# Altium PCB Electrode_Ribbon_PCB_v3.1.PcbDoc (part 3 of 5)
Units mil, origin at the board's own origin, x right, y up, seen from the top; angles counter-clockwise.
Board outline 8303.83 x 5482.84 mil, 2 copper layers (Top Layer, Bottom Layer), stack 3.556 mil thick; 265 components, 171 nets, 720 pads, 346 vias.
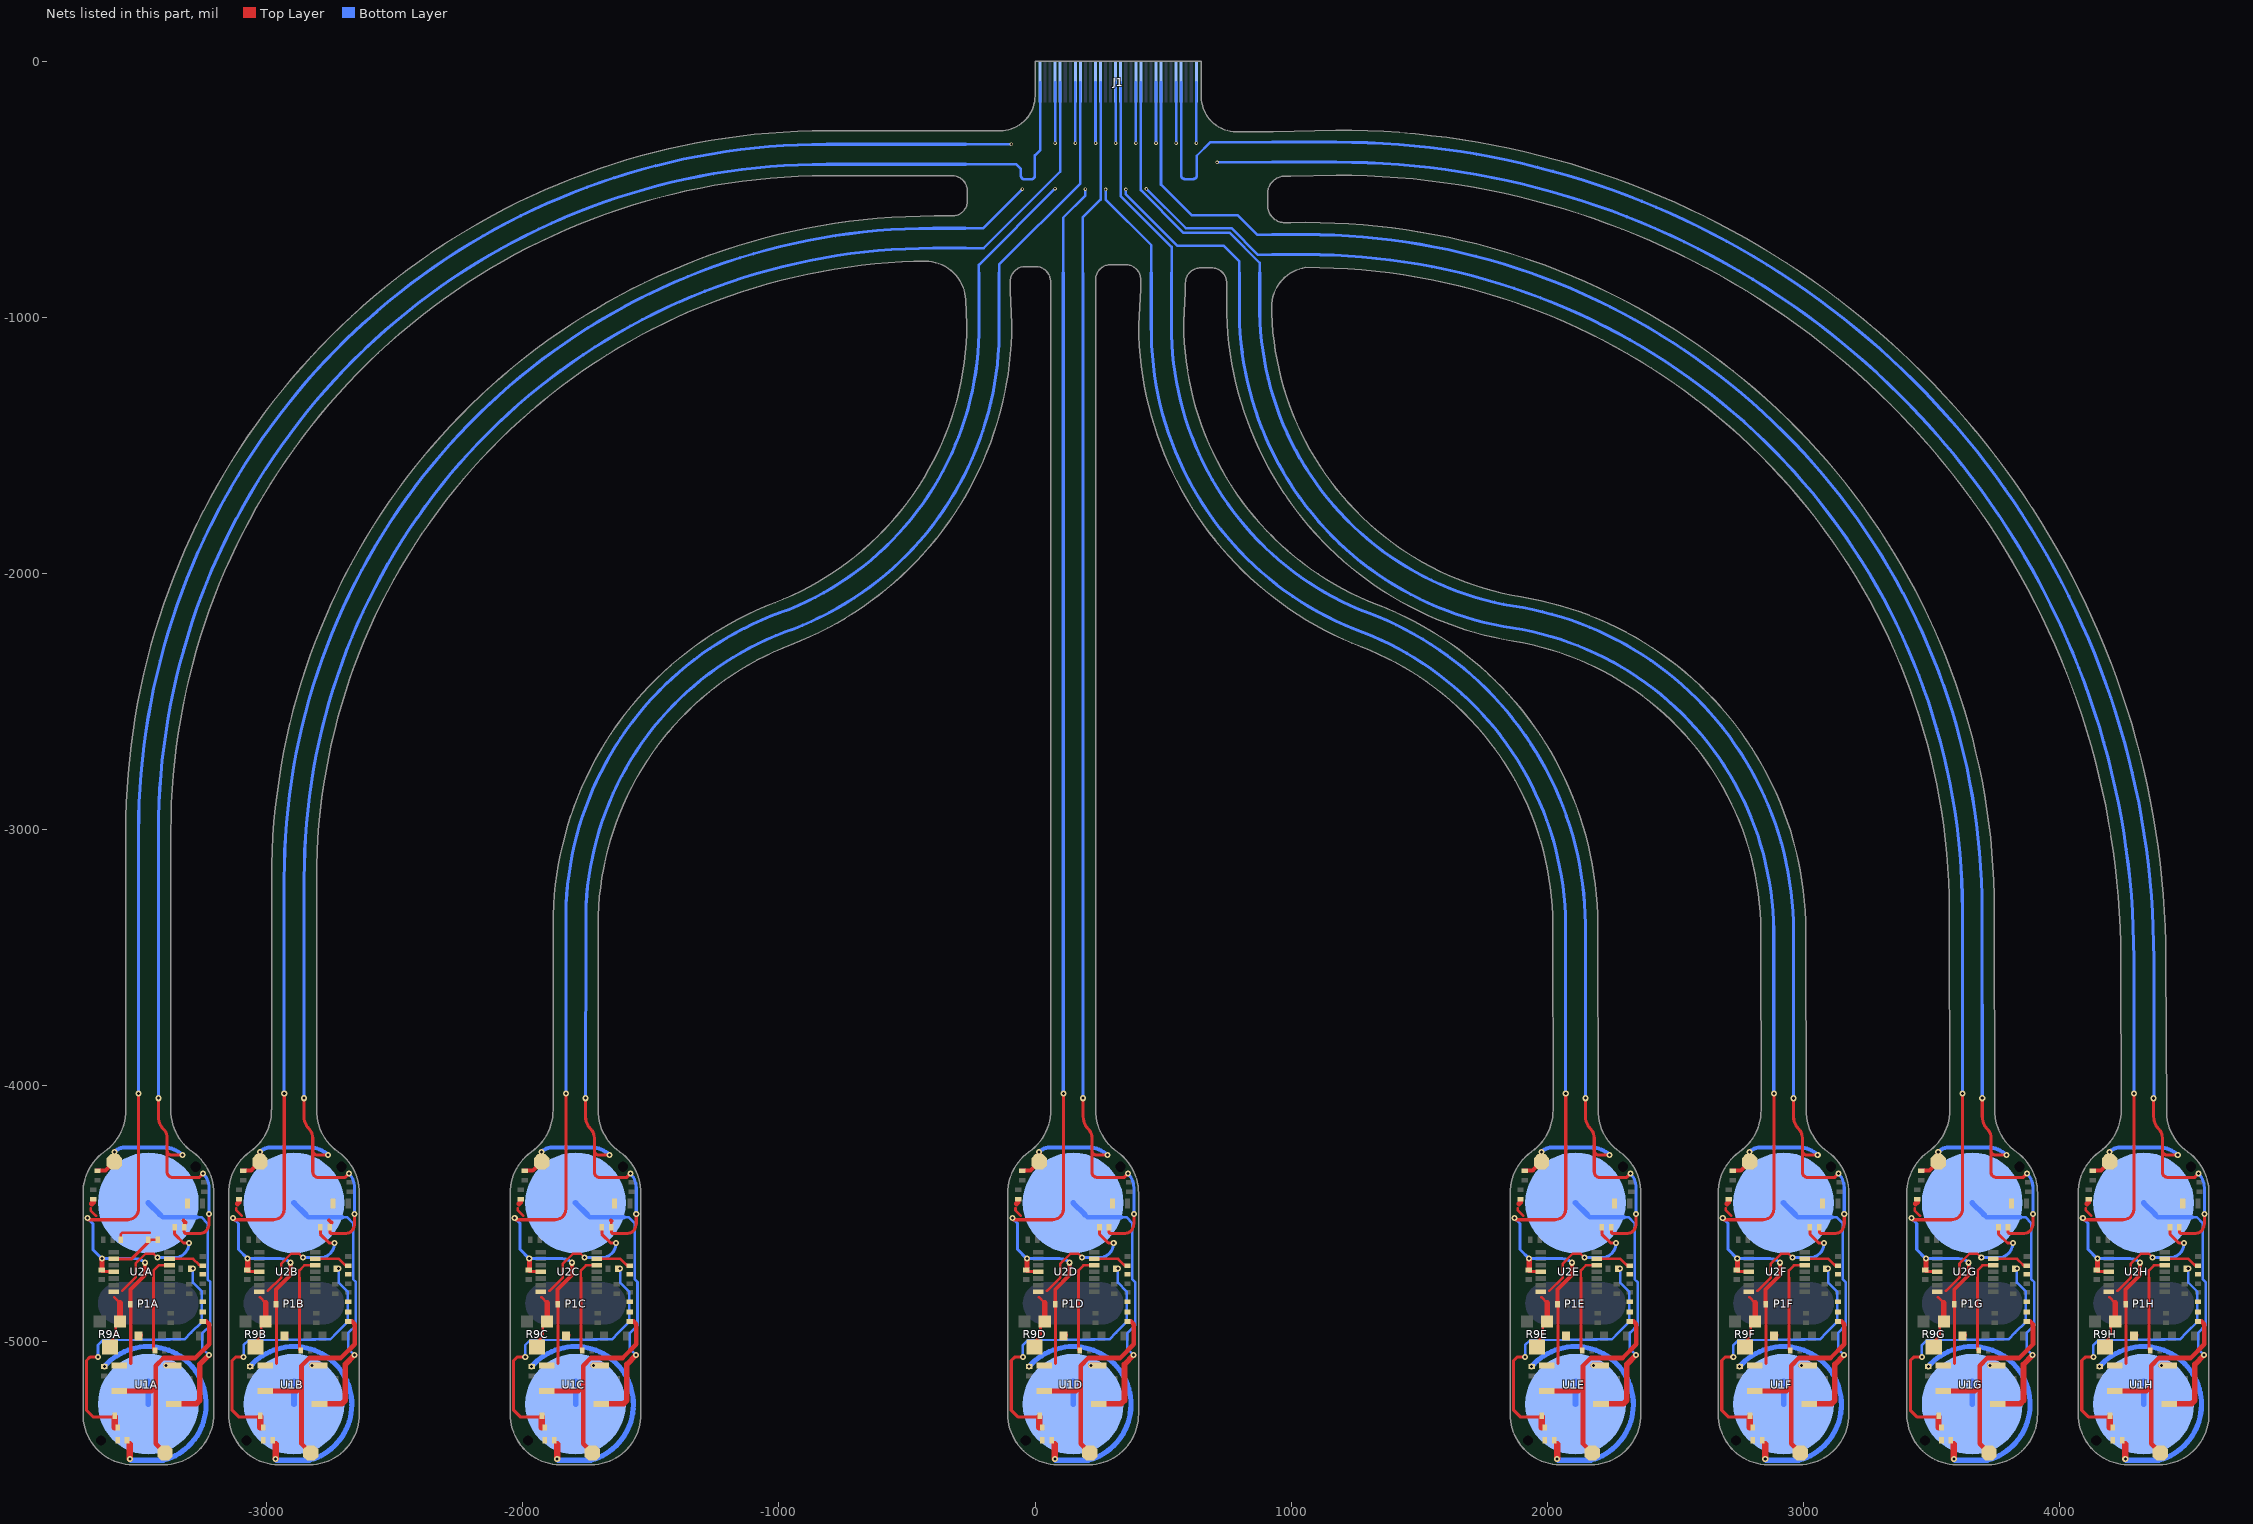
[diagram p2: the nets of this part, all layers, seen from the top]

## Via types
v1: diameter 23.62, hole 11.81, Top Layer to Bottom Layer, tented both sides, 304 vias
v2: diameter 13.78, hole 7.87, Top Layer to Bottom Layer, 42 vias

## Nets (pads, with @x,y where several pads share a name; then routed paths per layer and width w, separated by ;. In a path a pad name is that pad's centre, name@x,y a point inside that pad or via, vN(x,y) a via of type N, cw(c..) or ccw(c..) an arc to the next point about the centre after c; other vN are vias at no path point) (continued)
-VCC_3V3: C5A.1 C5B.1 C5C.1 C5D.1 C5E.1 C5F.1 C5G.1 C5H.1 C6A.1 C6B.1 C6C.1 C6D.1 C6E.1 C6F.1 C6G.1 C6H.1 J1.4 J1.8 J1.12 J1.16 J1.20 J1.24 J1.28 J1.32 SB2A.1 SB2B.1 SB2C.1 SB2D.1 SB2E.1 SB2F.1 SB2G.1 SB2H.1 SB4A.2 SB4B.2 SB4C.2 SB4D.2 SB4E.2 SB4F.2 SB4G.2 SB4H.2 SB5A.2 SB5B.2 SB5C.2 SB5D.2 SB5E.2 SB5F.2 SB5G.2 SB5H.2 U1A.5 U1B.5 U1C.5 U1D.5 U1E.5 U1F.5 U1G.5 U1H.5 U2A.11 U2B.11 U2C.11 U2D.11 U2E.11 U2F.11 U2G.11 U2H.11 | length 62483.9
  Top Layer w10: -3688.51,-4480.28 -3688.51,-4489.4 -3667.12,-4510.78 ; C6A.1@-3645.89,-4722.28 -3643.89,-4722.28 C6A.1@-3642.39,-4722.28 ; -3119.53,-4480.28 -3119.53,-4489.4 -3098.14,-4510.78 ; C6B.1@-3076.92,-4722.28 -3074.92,-4722.28 C6B.1@-3073.42,-4722.28 ; -2019.75,-4480.28 -2019.75,-4489.4 -1998.36,-4510.78 ; C6C.1@-1977.13,-4722.28 -1975.13,-4722.28 C6C.1@-1973.63,-4722.28 ; -76.26,-4480.28 -76.26,-4489.4 -54.87,-4510.78 ; C6D.1@-33.65,-4722.28 -31.65,-4722.28 C6D.1@-30.15,-4722.28 ; 1885.9,-4480.28 1885.9,-4489.4 1907.29,-4510.78 ; C6E.1@1928.52,-4722.28 1930.52,-4722.28 C6E.1@1932.02,-4722.28 ; 2698.62,-4480.29 2698.62,-4489.4 2720,-4510.79 ; C6F.1@2741.23,-4722.29 2743.23,-4722.29 C6F.1@2744.73,-4722.29 ; 3435.37,-4480.28 3435.37,-4489.4 3456.75,-4510.78 ; C6G.1@3477.98,-4722.28 3479.98,-4722.28 C6G.1@3481.48,-4722.28 ; 4104.84,-4480.28 4104.84,-4489.4 4126.23,-4510.78 ; C6H.1@4147.45,-4722.28 4149.45,-4722.28 C6H.1@4150.95,-4722.28
  Top Layer w12: v1@-3697.89,-4525.78 -3543.37,-4525.78 ccw(c-3543.37,-4483.76) -3501.35,-4483.76 v1(-3501.35,-4033) ; C6A.1@-3643.89,-4723.78 -3639.14,-4728.54 -3600.37,-4728.54 U2A.11@-3599.12,-4729.78 ; -3531.87,-5086.78 SB4A.2@-3531.87,-4860.78 ; v1@-3128.92,-4525.78 -2974.4,-4525.78 ccw(c-2974.4,-4483.76) -2932.38,-4483.76 v1(-2932.38,-4033) ; C6B.1@-3074.92,-4723.78 -3070.16,-4728.54 -3031.39,-4728.54 U2B.11@-3030.15,-4729.78 ; -2962.9,-5086.78 SB4B.2@-2962.9,-4860.78 ; v1@-2029.13,-4525.78 -1874.61,-4525.78 ccw(c-1874.61,-4483.76) -1832.59,-4483.76 v1(-1832.59,-4033) ; C6C.1@-1975.13,-4723.78 -1970.38,-4728.54 -1931.61,-4728.54 U2C.11@-1930.36,-4729.78 ; -1863.11,-5086.78 SB4C.2@-1863.11,-4860.78 ; v1@-85.65,-4525.78 68.87,-4525.78 ccw(c68.87,-4483.76) 110.89,-4483.76 v1(110.89,-4033) ; C6D.1@-31.65,-4723.78 -26.89,-4728.54 11.87,-4728.54 U2D.11@13.12,-4729.78 ; 80.37,-5086.78 SB4D.2@80.37,-4860.78 ; v1@1876.52,-4525.78 2031.04,-4525.78 ccw(c2031.04,-4483.76) 2073.06,-4483.76 v1(2073.06,-4033) ; C6E.1@1930.52,-4723.78 1935.27,-4728.54 1974.04,-4728.54 U2E.11@1975.28,-4729.78 ; 2042.54,-5086.78 SB4E.2@2042.54,-4860.78 ; v1@2689.23,-4525.79 2843.75,-4525.79 ccw(c2843.75,-4483.77) 2885.77,-4483.77 v1(2885.77,-4033.01) ; C6F.1@2743.23,-4723.79 2747.98,-4728.54 2786.75,-4728.54 U2F.11@2788,-4729.79 ; 2855.25,-5086.79 SB4F.2@2855.25,-4860.79 ; v1@3425.98,-4525.78 3580.5,-4525.78 ccw(c3580.5,-4483.76) 3622.52,-4483.76 v1(3622.52,-4033) ; C6G.1@3479.98,-4723.78 3484.73,-4728.54 3523.5,-4728.54 U2G.11@3524.75,-4729.78 ; 3592,-5086.78 SB4G.2@3592,-4860.78 ; v1@4095.45,-4525.78 4249.97,-4525.78 ccw(c4249.97,-4483.76) 4291.99,-4483.76 v1(4291.99,-4033) ; C6H.1@4149.45,-4723.78 4154.21,-4728.54 4192.98,-4728.54 U2H.11@4194.22,-4729.78 ; 4261.47,-5086.78 SB4H.2@4261.47,-4860.78
  Top Layer w15: SB4A.2@-3533.39,-4855.78 -3533.39,-4798.28 -3476.87,-4741.76 v1(-3476.87,-4693.78) ; SB4B.2@-2964.42,-4855.78 -2964.42,-4798.28 -2907.9,-4741.76 v1(-2907.9,-4693.78) ; SB4C.2@-1864.63,-4855.78 -1864.63,-4798.28 -1808.11,-4741.76 v1(-1808.11,-4693.78) ; SB4D.2@78.85,-4855.78 78.85,-4798.28 135.37,-4741.76 v1(135.37,-4693.78) ; SB4E.2@2041.02,-4855.78 2041.02,-4798.28 2097.54,-4741.76 v1(2097.54,-4693.78) ; SB4F.2@2853.73,-4855.79 2853.73,-4798.29 2910.25,-4741.77 v1(2910.25,-4693.79) ; SB4G.2@3590.48,-4855.78 3590.48,-4798.28 3647,-4741.76 v1(3647,-4693.78) ; SB4H.2@4259.95,-4855.78 4259.95,-4798.28 4316.47,-4741.76 v1(4316.47,-4693.78)
  Top Layer w20: -3684.12,-4463.42 -3678.12,-4457.42 ; C6A.1@-3643.89,-4723.78 -3643.89,-4722.28 v1@-3643.89,-4678.38 ; -3115.14,-4463.42 -3109.14,-4457.42 ; C6B.1@-3074.92,-4723.78 -3074.92,-4722.28 v1@-3074.92,-4678.38 ; -2015.36,-4463.42 -2009.36,-4457.42 ; C6C.1@-1975.13,-4723.78 -1975.13,-4722.28 v1@-1975.13,-4678.38 ; -71.87,-4463.42 -65.87,-4457.42 ; C6D.1@-31.65,-4723.78 -31.65,-4722.28 v1@-31.65,-4678.38 ; 1890.29,-4463.42 1896.29,-4457.42 ; C6E.1@1930.52,-4723.78 1930.52,-4722.28 v1@1930.52,-4678.38 ; 2703,-4463.42 2709,-4457.42 ; C6F.1@2743.23,-4723.79 2743.23,-4722.29 v1@2743.23,-4678.39 ; 3439.75,-4463.42 3445.75,-4457.42 ; C6G.1@3479.98,-4723.78 3479.98,-4722.28 v1@3479.98,-4678.38 ; 4109.23,-4463.42 4115.23,-4457.42 ; C6H.1@4149.45,-4723.78 4149.45,-4722.28 v1@4149.45,-4678.38
  Top Layer w22: -3535.89,-5401.78 -3535.2,-5402.47 ; v1@-3535.2,-5459.47 v1(-3534.89,-5459.78) ; -2966.92,-5401.78 -2966.23,-5402.47 ; v1@-2966.23,-5459.47 v1(-2965.92,-5459.78) ; -1867.13,-5401.78 -1866.44,-5402.47 ; v1@-1866.44,-5459.47 v1(-1866.13,-5459.78) ; 76.35,-5401.78 77.04,-5402.47 ; v1@77.04,-5459.47 v1(77.35,-5459.78) ; 2038.52,-5401.78 2039.21,-5402.47 ; v1@2039.21,-5459.47 v1(2039.52,-5459.78) ; 2851.23,-5401.79 2851.92,-5402.48 ; v1@2851.92,-5459.48 v1(2852.23,-5459.79) ; 3587.98,-5401.78 3588.67,-5402.47 ; v1@3588.67,-5459.47 v1(3588.98,-5459.78) ; 4257.45,-5401.78 4258.14,-5402.47 ; v1@4258.14,-5459.47 v1(4258.45,-5459.78)
  Top Layer w25: v1@-3535.2,-5459.47 -3535.2,-5402.47 ; v1@-2966.23,-5459.47 -2966.23,-5402.47 ; v1@-1866.44,-5459.47 -1866.44,-5402.47 ; v1@77.04,-5459.47 77.04,-5402.47 ; v1@2039.21,-5459.47 2039.21,-5402.47 ; v1@2851.92,-5459.48 2851.92,-5402.48 ; v1@3588.67,-5459.47 3588.67,-5402.47 ; v1@4258.14,-5459.47 4258.14,-5402.47
  Bottom Layer w10: -271.25,-653.11 -201.79,-653.11 v2(-49.25,-500.56) ; -269.25,-325.11 v2(-92.25,-325.11) ; -219.21,-825.67 -219.21,-796.87 v2(78.94,-498.72) ; v2@78.81,-321.11 J1.4@78.81,-83.01 ; 110.37,-826.74 110.37,-611.5 196.51,-525.36 v2(196.51,-500.56) ; v2@157.55,-321.11 J1.8@157.55,-83.01 ; v2@236.29,-321.11 J1.12@236.29,-83.01 ; v2@275.66,-501.11 275.66,-541.02 454.05,-719.4 454.05,-825.32 ; v2@315.03,-321.11 J1.16@315.03,-83.01 ; v2(354.53,-501.11) 354.53,-520.89 554.75,-721.11 735.75,-721.11 798.36,-783.72 798.36,-826.03 ; v2@393.77,-321.11 J1.20@393.77,-83.01 ; v2(435.16,-499.63) 435.23,-499.63 588.71,-653.11 766.8,-653.11 869.8,-756.11 925.76,-756.11 ; v2@472.51,-321.11 J1.24@472.51,-83.01 ; v2(551.25,-321.11) J1.28@551.25,-83.01 ; v2@629.99,-321.11 J1.32@629.99,-83.01 ; v2(711.75,-396.11) 712.75,-395.11 925.05,-395.11
  Bottom Layer w12: v1(-3700.89,-4519.78) -3679.89,-4540.78 -3679.89,-4642.38 v1(-3644.19,-4678.08) -3514.78,-4678.08 cw(c-3514.78,-4731.69) v1(-3476.87,-4693.78) ; v1(-3501.35,-4033) -3501.37,-3009.22 cw(c-815.75,-3010.73) -814.25,-325.11 -269.25,-325.11 ; v1(-3131.92,-4519.78) -3110.92,-4540.78 -3110.92,-4642.38 v1(-3075.21,-4678.08) -2945.8,-4678.08 cw(c-2945.8,-4731.69) v1(-2907.9,-4693.78) ; v1@-2932.65,-4033 -2932.65,-3194.11 cw(c-395.45,-3190.32) -399.25,-653.11 -271.25,-653.11 ; v1(-2032.13,-4519.78) -2011.13,-4540.78 -2011.13,-4642.38 v1(-1975.43,-4678.08) -1846.02,-4678.08 cw(c-1846.02,-4731.69) v1(-1808.11,-4693.78) ; v1@-1832.65,-4033 -1832.65,-3370.05 cw(c-555.01,-3353.82) -959.61,-2141.82 ccw(c-1408.16,-1040.09) -218.68,-1027.96 -219.21,-825.67 ; v1(-88.65,-4519.78) -67.65,-4540.78 -67.65,-4642.38 v1(-31.95,-4678.08) 97.46,-4678.08 cw(c97.46,-4731.69) v1(135.37,-4693.78) ; v1@110.37,-4033 110.37,-826.74 ; 454.05,-825.32 454.05,-1033.93 ccw(c1716.7,-1046.59) 1246.26,-2218.4 cw(c831.32,-3388.66) 2072.87,-3373.1 v1@2072.87,-4033 ; 798.36,-826.03 798.36,-947.53 ccw(c2055.5,-971.86) 1829.91,-2208.83 cw(c1676.03,-3408.41) 2885.37,-3395.15 v1@2885.37,-4033.01 ; 925.05,-395.11 1176.75,-395.11 cw(c1179.31,-3507.67) 4291.87,-3505.11 v1@4291.87,-4033 ; 925.76,-756.11 1057.75,-756.11 cw(c1060.56,-3317.92) 3622.37,-3315.11 v1@3622.37,-4033 ; v1(1873.52,-4519.78) 1894.52,-4540.78 1894.52,-4642.38 v1(1930.22,-4678.08) 2059.63,-4678.08 cw(c2059.63,-4731.69) v1(2097.54,-4693.78) ; v1(2686.23,-4519.79) 2707.23,-4540.79 2707.23,-4642.39 v1(2742.93,-4678.09) 2872.34,-4678.09 cw(c2872.34,-4731.7) v1(2910.25,-4693.79) ; v1(3422.98,-4519.78) 3443.98,-4540.78 3443.98,-4642.38 v1(3479.68,-4678.08) 3609.09,-4678.08 cw(c3609.09,-4731.69) v1(3647,-4693.78) ; v1(4092.45,-4519.78) 4113.45,-4540.78 4113.45,-4642.38 v1(4149.15,-4678.08) 4278.56,-4678.08 cw(c4278.56,-4731.69) v1(4316.47,-4693.78)
  Bottom Layer w20: v1(-3634.89,-5099.28) cw(c-3463.74,-5247.31) -3403.39,-5465.41 -3529.27,-5465.41 cw(c-3529.27,-5459.78) v1(-3534.89,-5459.78) ; v1(-3065.92,-5099.28) cw(c-2894.76,-5247.31) -2834.42,-5465.41 -2960.29,-5465.41 cw(c-2960.29,-5459.78) v1(-2965.92,-5459.78) ; v1(-1966.13,-5099.28) cw(c-1794.98,-5247.31) -1734.63,-5465.41 -1860.51,-5465.41 cw(c-1860.51,-5459.78) v1(-1866.13,-5459.78) ; v1(-22.65,-5099.28) cw(c148.51,-5247.31) 208.85,-5465.41 82.98,-5465.41 cw(c82.98,-5459.78) v1(77.35,-5459.78) ; v1(1939.52,-5099.28) cw(c2110.67,-5247.31) 2171.02,-5465.41 2045.14,-5465.41 cw(c2045.14,-5459.78) v1(2039.52,-5459.78) ; v1(2752.23,-5099.29) cw(c2923.39,-5247.32) 2983.73,-5465.41 2857.85,-5465.41 cw(c2857.85,-5459.79) v1(2852.23,-5459.79) ; v1(3488.98,-5099.28) cw(c3660.14,-5247.31) 3720.48,-5465.41 3594.6,-5465.41 cw(c3594.6,-5459.78) v1(3588.98,-5459.78) ; v1(4158.45,-5099.28) cw(c4329.61,-5247.31) 4389.95,-5465.41 4264.08,-5465.41 cw(c4264.08,-5459.78) v1(4258.45,-5459.78)
  other v2: 275.79,-501.11 78.94,-321.11 157.68,-321.11 236.42,-321.11 315.16,-321.11 393.9,-321.11 472.64,-321.11 630.12,-321.11
ENDA: P1A.1 U1A.4 | length 118.9
  Top Layer w22: v1(-3393.56,-5094.78) U1A.4@-3363.57,-5094.78
  Bottom Layer w22: P1A.1@-3463.14,-5246.62 -3463.14,-5158.05 P1A.1@-3462.87,-5157.78
ENDB: P1B.1 U1B.4 | length 118.9
  Top Layer w22: v1(-2824.59,-5094.78) U1B.4@-2794.6,-5094.78
  Bottom Layer w22: P1B.1@-2894.16,-5246.61 -2894.16,-5158.05 P1B.1@-2893.9,-5157.78
ENDC: P1C.1 U1C.4 | length 118.9
  Top Layer w22: v1(-1724.8,-5094.78) U1C.4@-1694.81,-5094.78
  Bottom Layer w22: P1C.1@-1794.38,-5246.62 -1794.38,-5158.05 P1C.1@-1794.11,-5157.78
ENDD: P1D.1 U1D.4 | length 118.9
  Top Layer w22: v1(218.68,-5094.78) U1D.4@248.67,-5094.78
  Bottom Layer w22: P1D.1@149.11,-5246.61 149.11,-5158.05 P1D.1@149.37,-5157.78
ENDE: P1E.1 U1E.4 | length 118.9
  Top Layer w22: v1(2180.85,-5094.78) U1E.4@2210.83,-5094.78
  Bottom Layer w22: P1E.1@2111.27,-5246.62 2111.27,-5158.05 P1E.1@2111.54,-5157.78
ENDF: P1F.1 U1F.4 | length 118.9
  Top Layer w22: v1(2993.56,-5094.79) U1F.4@3023.55,-5094.79
  Bottom Layer w22: P1F.1@2923.98,-5246.62 2923.98,-5158.06 P1F.1@2924.25,-5157.79
ENDG: P1G.1 U1G.4 | length 118.9
  Top Layer w22: v1(3730.31,-5094.78) U1G.4@3760.3,-5094.78
  Bottom Layer w22: P1G.1@3660.73,-5246.61 3660.73,-5158.05 P1G.1@3661,-5157.78
ENDH: P1H.1 U1H.4 | length 118.9
  Top Layer w22: v1(4399.78,-5094.78) U1H.4@4429.77,-5094.78
  Bottom Layer w22: P1H.1@4330.21,-5246.62 4330.21,-5158.05 P1H.1@4330.47,-5157.78
IN2NA: R2A.1 R6A.1 U2A.6 | length 141.2
  Top Layer w10: U2A.6@-3380.62,-4678.6 -3288.07,-4678.6 -3265.89,-4700.78 -3260.39,-4706.28 R6A.1@-3250.87,-4706.28
IN2NB: R2B.1 R6B.1 U2B.6 | length 141.2
  Top Layer w10: U2B.6@-2811.64,-4678.6 -2719.1,-4678.6 -2696.92,-4700.78 -2691.42,-4706.28 R6B.1@-2681.9,-4706.28
IN2NC: R2C.1 R6C.1 U2C.6 | length 141.2
  Top Layer w10: U2C.6@-1711.86,-4678.6 -1619.31,-4678.6 -1597.13,-4700.78 -1591.63,-4706.28 R6C.1@-1582.11,-4706.28
IN2ND: R2D.1 R6D.1 U2D.6 | length 141.2
  Top Layer w10: U2D.6@231.62,-4678.6 324.17,-4678.6 346.35,-4700.78 351.85,-4706.28 R6D.1@361.37,-4706.28
IN2NE: R2E.1 R6E.1 U2E.6 | length 141.2
  Top Layer w10: U2E.6@2193.79,-4678.6 2286.33,-4678.6 2308.52,-4700.78 2314.02,-4706.28 R6E.1@2323.54,-4706.28
IN2NF: R2F.1 R6F.1 U2F.6 | length 141.2
  Top Layer w10: U2F.6@3006.5,-4678.61 3099.05,-4678.61 3121.23,-4700.79 3126.73,-4706.29 R6F.1@3136.25,-4706.29
IN2NG: R2G.1 R6G.1 U2G.6 | length 141.2
  Top Layer w10: U2G.6@3743.25,-4678.6 3835.8,-4678.6 3857.98,-4700.78 3863.48,-4706.28 R6G.1@3873,-4706.28
IN2NH: R2H.1 R6H.1 U2H.6 | length 141.2
  Top Layer w10: U2H.6@4412.72,-4678.6 4505.27,-4678.6 4527.45,-4700.78 4532.95,-4706.28 R6H.1@4542.47,-4706.28
IN2PA: D2A.1 R5A.2 U2A.5 | length 397.8
  Top Layer w10: D2A.1@-3497.06,-4982.78 -3488.89,-4974.62 D2A.1@-3488.89,-4978.7 ; -3442.39,-4750.78 -3442.39,-4723.3 -3423.28,-4704.19 U2A.5@-3380.62,-4704.19 U2A.5@-3379.64,-4704.19
  Top Layer w12: R5A.2@-3442.39,-5034.78 -3442.39,-4750.78
IN2PB: D2B.1 R5B.2 U2B.5 | length 397.8
  Top Layer w10: D2B.1@-2928.08,-4982.78 -2919.92,-4974.62 D2B.1@-2919.92,-4978.7 ; -2873.42,-4750.78 -2873.42,-4723.3 -2854.31,-4704.19 U2B.5@-2811.64,-4704.19 U2B.5@-2810.66,-4704.19
  Top Layer w12: R5B.2@-2873.42,-5034.78 -2873.42,-4750.78
IN2PC: D2C.1 R5C.2 U2C.5 | length 397.8
  Top Layer w10: D2C.1@-1828.3,-4982.78 -1820.13,-4974.62 D2C.1@-1820.13,-4978.7 ; -1773.63,-4750.78 -1773.63,-4723.3 -1754.52,-4704.19 U2C.5@-1711.86,-4704.19 U2C.5@-1710.88,-4704.19
  Top Layer w12: R5C.2@-1773.63,-5034.78 -1773.63,-4750.78
IN2PD: D2D.1 R5D.2 U2D.5 | length 397.8
  Top Layer w10: D2D.1@115.19,-4982.78 123.35,-4974.62 D2D.1@123.35,-4978.7 ; 169.85,-4750.78 169.85,-4723.3 188.96,-4704.19 U2D.5@231.62,-4704.19 U2D.5@232.61,-4704.19
  Top Layer w12: R5D.2@169.85,-5034.78 169.85,-4750.78
IN2PE: D2E.1 R5E.2 U2E.5 | length 397.8
  Top Layer w10: D2E.1@2077.35,-4982.78 2085.52,-4974.62 D2E.1@2085.52,-4978.7 ; 2132.02,-4750.78 2132.02,-4723.3 2151.13,-4704.19 U2E.5@2193.79,-4704.19 U2E.5@2194.77,-4704.19
  Top Layer w12: R5E.2@2132.02,-5034.78 2132.02,-4750.78
IN2PF: D2F.1 R5F.2 U2F.5 | length 397.8
  Top Layer w10: D2F.1@2890.06,-4982.79 2898.23,-4974.62 D2F.1@2898.23,-4978.71 ; 2944.73,-4750.79 2944.73,-4723.31 2963.84,-4704.2 U2F.5@3006.5,-4704.2 U2F.5@3007.48,-4704.2
  Top Layer w12: R5F.2@2944.73,-5034.79 2944.73,-4750.79
IN2PG: D2G.1 R5G.2 U2G.5 | length 397.8
  Top Layer w10: D2G.1@3626.81,-4982.78 3634.98,-4974.62 D2G.1@3634.98,-4978.7 ; 3681.48,-4750.78 3681.48,-4723.3 3700.59,-4704.19 U2G.5@3743.25,-4704.19 U2G.5@3744.23,-4704.19
  Top Layer w12: R5G.2@3681.48,-5034.78 3681.48,-4750.78
IN2PH: D2H.1 R5H.2 U2H.5 | length 397.8
  Top Layer w10: D2H.1@4296.29,-4982.78 4304.45,-4974.62 D2H.1@4304.45,-4978.7 ; 4350.95,-4750.78 4350.95,-4723.3 4370.06,-4704.19 U2H.5@4412.72,-4704.19 U2H.5@4413.71,-4704.19
  Top Layer w12: R5H.2@4350.95,-5034.78 4350.95,-4750.78
Measure#A: C3A.1 P2A.1 U1A.7 | length 849.7
  Top Layer w18: U1A.7@-3576.17,-5194.78 -3450.89,-5194.78 -3437.89,-5181.78 ; P2A.1@-3397.89,-5436.78 -3433.89,-5400.78 -3433.89,-5181.78 -3433.89,-5095.78 -3403.89,-5065.78 -3279.89,-5065.78 -3225.89,-5011.78 -3225.89,-4933.83 -3236.44,-4923.28 C3A.1@-3250.87,-4923.28
Measure#B: C3B.1 P2B.1 U1B.7 | length 849.7
  Top Layer w18: U1B.7@-3007.2,-5194.78 -2881.92,-5194.78 -2868.92,-5181.78 ; P2B.1@-2828.92,-5436.78 -2864.92,-5400.78 -2864.92,-5181.78 -2864.92,-5095.78 -2834.92,-5065.78 -2710.92,-5065.78 -2656.92,-5011.78 -2656.92,-4933.83 -2667.46,-4923.28 C3B.1@-2681.9,-4923.28
Measure#C: C3C.1 P2C.1 U1C.7 | length 849.7
  Top Layer w18: U1C.7@-1907.41,-5194.78 -1782.13,-5194.78 -1769.13,-5181.78 ; P2C.1@-1729.13,-5436.78 -1765.13,-5400.78 -1765.13,-5181.78 -1765.13,-5095.78 -1735.13,-5065.78 -1611.13,-5065.78 -1557.13,-5011.78 -1557.13,-4933.83 -1567.68,-4923.28 C3C.1@-1582.11,-4923.28
Measure#D: C3D.1 P2D.1 U1D.7 | length 849.7
  Top Layer w18: U1D.7@36.07,-5194.78 161.35,-5194.78 174.35,-5181.78 ; P2D.1@214.35,-5436.78 178.35,-5400.78 178.35,-5181.78 178.35,-5095.78 208.35,-5065.78 332.35,-5065.78 386.35,-5011.78 386.35,-4933.83 375.81,-4923.28 C3D.1@361.37,-4923.28
Measure#E: C3E.1 P2E.1 U1E.7 | length 849.7
  Top Layer w18: U1E.7@1998.24,-5194.78 2123.52,-5194.78 2136.52,-5181.78 ; P2E.1@2176.52,-5436.78 2140.52,-5400.78 2140.52,-5181.78 2140.52,-5095.78 2170.52,-5065.78 2294.52,-5065.78 2348.52,-5011.78 2348.52,-4933.83 2337.97,-4923.28 C3E.1@2323.54,-4923.28
Measure#F: C3F.1 P2F.1 U1F.7 | length 849.7
  Top Layer w18: U1F.7@2810.95,-5194.79 2936.23,-5194.79 2949.23,-5181.79 ; P2F.1@2989.23,-5436.79 2953.23,-5400.79 2953.23,-5181.79 2953.23,-5095.79 2983.23,-5065.79 3107.23,-5065.79 3161.23,-5011.79 3161.23,-4933.83 3150.68,-4923.29 C3F.1@3136.25,-4923.29
Measure#G: C3G.1 P2G.1 U1G.7 | length 849.7
  Top Layer w18: U1G.7@3547.7,-5194.78 3672.98,-5194.78 3685.98,-5181.78 ; P2G.1@3725.98,-5436.78 3689.98,-5400.78 3689.98,-5181.78 3689.98,-5095.78 3719.98,-5065.78 3843.98,-5065.78 3897.98,-5011.78 3897.98,-4933.83 3887.43,-4923.28 C3G.1@3873,-4923.28
Measure#H: C3H.1 P2H.1 U1H.7 | length 849.7
  Top Layer w18: U1H.7@4217.17,-5194.78 4342.45,-5194.78 4355.45,-5181.78 ; P2H.1@4395.45,-5436.78 4359.45,-5400.78 4359.45,-5181.78 4359.45,-5095.78 4389.45,-5065.78 4513.45,-5065.78 4567.45,-5011.78 4567.45,-4933.83 4556.91,-4923.28 C3H.1@4542.47,-4923.28
Measure*A: R9A.1 R9A.2 SB8A.1 U2A.14 | length 692.7
  Top Layer w10: R9A.2@-3638.24,-5003.78 -3613.89,-5003.78 -3599.89,-4989.78 ; -3596.87,-4828.28 -3574.15,-4851 ; -3590.87,-4972.78 -3590.87,-4939.5 R9A.1@-3574.15,-4922.78 ; -3565.89,-4803.78 -3512.89,-4750.78 -3512.89,-4697.54 -3474.13,-4658.78 -3443.08,-4658.78 v1(-3427.89,-4673.97)
  Top Layer w12: SB8A.1@-3360.39,-4555.78 -3360.39,-4582.28 -3325.77,-4616.91 v1(-3304.77,-4616.91)
  Top Layer w22: R9A.1@-3574.15,-4922.78 -3574.15,-4851
  Bottom Layer w12: v1(-3427.89,-4673.97) -3364.38,-4673.97 ccw(c-3361.88,-4616.91) v1(-3304.77,-4616.91)
Measure*B: R9B.1 R9B.2 SB8B.1 U2B.14 | length 692.7
  Top Layer w10: R9B.2@-3069.26,-5003.78 -3044.92,-5003.78 -3030.92,-4989.78 ; -3027.9,-4828.28 -3005.18,-4851 ; -3021.9,-4972.78 -3021.9,-4939.5 R9B.1@-3005.18,-4922.78 ; -2996.92,-4803.78 -2943.92,-4750.78 -2943.92,-4697.54 -2905.16,-4658.78 -2874.11,-4658.78 v1(-2858.92,-4673.97)
  Top Layer w12: SB8B.1@-2791.42,-4555.78 -2791.42,-4582.28 -2756.79,-4616.91 v1(-2735.79,-4616.91)
  Top Layer w22: R9B.1@-3005.18,-4922.78 -3005.18,-4851
  Bottom Layer w12: v1(-2858.92,-4673.97) -2795.4,-4673.97 ccw(c-2792.9,-4616.91) v1(-2735.79,-4616.91)
Measure*C: R9C.1 R9C.2 SB8C.1 U2C.14 | length 692.7
  Top Layer w10: R9C.2@-1969.48,-5003.78 -1945.13,-5003.78 -1931.13,-4989.78 ; -1928.11,-4828.28 -1905.39,-4851 ; -1922.11,-4972.78 -1922.11,-4939.5 R9C.1@-1905.39,-4922.78 ; -1897.13,-4803.78 -1844.13,-4750.78 -1844.13,-4697.54 -1805.37,-4658.78 -1774.32,-4658.78 v1(-1759.13,-4673.97)
  Top Layer w12: SB8C.1@-1691.63,-4555.78 -1691.63,-4582.28 -1657.01,-4616.91 v1(-1636.01,-4616.91)
  Top Layer w22: R9C.1@-1905.39,-4922.78 -1905.39,-4851
  Bottom Layer w12: v1(-1759.13,-4673.97) -1695.62,-4673.97 ccw(c-1693.12,-4616.91) v1(-1636.01,-4616.91)
Measure*D: R9D.1 R9D.2 SB8D.1 U2D.14 | length 692.7
  Top Layer w10: R9D.2@-26,-5003.78 -1.65,-5003.78 12.35,-4989.78 ; 15.37,-4828.28 38.09,-4851 ; 21.37,-4972.78 21.37,-4939.5 R9D.1@38.09,-4922.78 ; 46.35,-4803.78 99.35,-4750.78 99.35,-4697.54 138.11,-4658.78 169.16,-4658.78 v1(184.35,-4673.97)
  Top Layer w12: SB8D.1@251.85,-4555.78 251.85,-4582.28 286.48,-4616.91 v1(307.48,-4616.91)
  Top Layer w22: R9D.1@38.09,-4922.78 38.09,-4851
  Bottom Layer w12: v1(184.35,-4673.97) 247.86,-4673.97 ccw(c250.36,-4616.91) v1(307.48,-4616.91)
Measure*E: R9E.1 R9E.2 SB8E.1 U2E.14 | length 692.7
  Top Layer w10: R9E.2@1936.17,-5003.78 1960.52,-5003.78 1974.52,-4989.78 ; 1977.54,-4828.28 2000.26,-4851 ; 1983.54,-4972.78 1983.54,-4939.5 R9E.1@2000.26,-4922.78 ; 2008.52,-4803.78 2061.52,-4750.78 2061.52,-4697.54 2100.28,-4658.78 2131.33,-4658.78 v1(2146.52,-4673.97)
  Top Layer w12: SB8E.1@2214.02,-4555.78 2214.02,-4582.28 2248.64,-4616.91 v1(2269.64,-4616.91)
  Top Layer w22: R9E.1@2000.26,-4922.78 2000.26,-4851
  Bottom Layer w12: v1(2146.52,-4673.97) 2210.03,-4673.97 ccw(c2212.53,-4616.91) v1(2269.64,-4616.91)
Measure*F: R9F.1 R9F.2 SB8F.1 U2F.14 | length 692.7
  Top Layer w10: R9F.2@2748.88,-5003.79 2773.23,-5003.79 2787.23,-4989.79 ; 2790.25,-4828.29 2812.97,-4851.01 ; 2796.25,-4972.79 2796.25,-4939.51 R9F.1@2812.97,-4922.79 ; 2821.23,-4803.79 2874.23,-4750.79 2874.23,-4697.55 2912.99,-4658.79 2944.04,-4658.79 v1(2959.23,-4673.98)
  Top Layer w12: SB8F.1@3026.73,-4555.79 3026.73,-4582.29 3061.36,-4616.92 v1(3082.36,-4616.92)
  Top Layer w22: R9F.1@2812.97,-4922.79 2812.97,-4851.01
  Bottom Layer w12: v1(2959.23,-4673.98) 3022.74,-4673.98 ccw(c3025.24,-4616.92) v1(3082.36,-4616.92)
Measure*G: R9G.1 R9G.2 SB8G.1 U2G.14 | length 692.7
  Top Layer w10: R9G.2@3485.63,-5003.78 3509.98,-5003.78 3523.98,-4989.78 ; 3527,-4828.28 3549.72,-4851 ; 3533,-4972.78 3533,-4939.5 R9G.1@3549.72,-4922.78 ; 3557.98,-4803.78 3610.98,-4750.78 3610.98,-4697.54 3649.74,-4658.78 3680.79,-4658.78 v1(3695.98,-4673.97)
  Top Layer w12: SB8G.1@3763.48,-4555.78 3763.48,-4582.28 3798.1,-4616.91 v1(3819.1,-4616.91)
  Top Layer w22: R9G.1@3549.72,-4922.78 3549.72,-4851
  Bottom Layer w12: v1(3695.98,-4673.97) 3759.49,-4673.97 ccw(c3761.99,-4616.91) v1(3819.1,-4616.91)
Measure*H: R9H.1 R9H.2 SB8H.1 U2H.14 | length 692.7
  Top Layer w10: R9H.2@4155.1,-5003.78 4179.45,-5003.78 4193.45,-4989.78 ; 4196.47,-4828.28 4219.19,-4851 ; 4202.47,-4972.78 4202.47,-4939.5 R9H.1@4219.19,-4922.78 ; 4227.45,-4803.78 4280.45,-4750.78 4280.45,-4697.54 4319.21,-4658.78 4350.26,-4658.78 v1(4365.45,-4673.97)
  Top Layer w12: SB8H.1@4432.95,-4555.78 4432.95,-4582.28 4467.58,-4616.91 v1(4488.58,-4616.91)
  Top Layer w22: R9H.1@4219.19,-4922.78 4219.19,-4851
  Bottom Layer w12: v1(4365.45,-4673.97) 4428.97,-4673.97 ccw(c4431.46,-4616.91) v1(4488.58,-4616.91)
MeasureA: J1.1 LED1A.1 P3A.1 SB7A.2 SB8A.2 | length 7680.2
  Top Layer w10: SB8A.2@-3323.39,-4555.78 -3323.39,-4530.28
  Top Layer w12: v1(-3424.07,-4051.29) -3424.07,-4122.99 ccw(c-3355.36,-4123.05) -3404.25,-4171.33 ; -3404.25,-4171.33 cw(c-3438.66,-4205.74) -3390,-4205.74 -3390,-4254.8 ; v1(-3329.89,-4273.78) -3371.01,-4273.78 cw(c-3371.01,-4254.8) -3390,-4254.8 ; SB8A.2@-3323.39,-4555.78 -3323.39,-4570.33 ccw(c-3311.44,-4570.33) -3319.89,-4578.78 -3258.21,-4578.78 ccw(c-3258.21,-4551.47) -3238.89,-4570.78 ccw(c-3269.39,-4540.29) -3226.26,-4540.29 v1(-3226.26,-4503.69) ; v1(-3248.89,-4345.78) -3263.42,-4360.31 -3369.39,-4360.31 cw(c-3369.39,-4339.71) -3390,-4339.71 -3390,-4254.8
  Top Layer w15: -3325.89,-4527.78 -3323.39,-4530.28 -3316.89,-4536.78
  Top Layer w16: SB7A.2@-3661.89,-4334.28 -3630.39,-4334.28 P3A.1@-3595.89,-4299.78
  Top Layer w20: P3A.1@-3595.89,-4299.78 v1(-3595.89,-4260.78)
  Bottom Layer w10: -269.25,-403.11 -74.25,-403.11 -55.25,-422.11 -55.25,-447.11 ccw(c-40.25,-447.11) -40.25,-462.11 -15.25,-462.11 ccw(c-15.25,-447.11) -0.25,-447.11 -0.25,-369.11 19.75,-349.11 J1.1@19.75,-83.01
  Bottom Layer w12: v1(-3424.07,-4051.29) -3424.07,-3008.33 cw(c-816.55,-3010.64) -814.25,-403.11 -269.25,-403.11 ; v1(-3248.89,-4345.78) cw(c-3303.53,-4400.42) -3226.26,-4400.42 v1(-3226.26,-4503.69)
  Bottom Layer w15: v1(-3595.89,-4260.78) cw(c-3554.85,-4301.83) -3554.85,-4243.78 -3401.31,-4243.78 cw(c-3401.31,-4343.78) -3330.6,-4273.07 v1(-3329.89,-4273.78)
MeasureB: J1.5 LED1B.1 P3B.1 SB7B.2 SB8B.2 | length 6971.7
  Top Layer w12: v1(-2855.1,-4051.29) -2855.1,-4122.99 ccw(c-2786.38,-4123.05) -2835.28,-4171.33 cw(c-2869.69,-4205.74) -2821.02,-4205.74 -2821.02,-4254.8 ; v1(-2760.92,-4273.78) -2802.04,-4273.78 cw(c-2802.04,-4254.8) -2821.02,-4254.8 ; SB8B.2@-2754.42,-4555.78 -2754.42,-4570.33 ccw(c-2742.47,-4570.33) -2750.92,-4578.78 -2689.23,-4578.78 ccw(c-2689.23,-4551.47) -2669.92,-4570.78 ccw(c-2700.41,-4540.29) -2657.28,-4540.29 v1(-2657.28,-4503.69) ; v1(-2679.92,-4345.78) -2694.45,-4360.31 -2800.42,-4360.31 cw(c-2800.42,-4339.71) -2821.02,-4339.71 -2821.02,-4254.8
  Top Layer w15: -2756.92,-4527.78 -2747.92,-4536.78
  Top Layer w16: SB7B.2@-3092.92,-4334.28 -3061.42,-4334.28 P3B.1@-3026.92,-4299.78
  Top Layer w20: P3B.1@-3026.92,-4299.78 v1(-3026.92,-4260.78)
  Bottom Layer w10: -269.25,-731.11 -200.12,-731.11 98.49,-432.5 J1.5@98.49,-83.01
  Bottom Layer w12: v1(-2855.1,-4051.29) -2854.47,-3192.7 cw(c-396.07,-3189.52) -399.25,-731.11 -269.25,-731.11 ; v1@-2761.63,-4273.07 v1(-2760.92,-4273.78) ; v1(-2679.92,-4345.78) cw(c-2734.55,-4400.42) -2657.28,-4400.42 v1(-2657.28,-4503.69)
  Bottom Layer w15: v1(-3026.92,-4260.78) cw(c-2985.87,-4301.83) -2985.87,-4243.78 -2832.34,-4243.78 cw(c-2832.34,-4343.78) -2761.63,-4273.07 v1(-2760.92,-4273.78)
MeasureC: J1.9 LED1C.1 P3C.1 SB7C.2 SB8C.2 | length 6088.7
  Top Layer w10: SB8C.2@-1654.63,-4555.78 -1654.63,-4530.28
  Top Layer w12: v1(-1755.31,-4051.29) -1755.31,-4122.99 ccw(c-1686.6,-4123.05) -1735.49,-4171.33 cw(c-1769.9,-4205.74) -1721.24,-4205.74 -1721.24,-4254.8 ; v1(-1661.13,-4273.78) -1702.25,-4273.78 cw(c-1702.25,-4254.8) -1721.24,-4254.8 ; SB8C.2@-1654.63,-4555.78 -1654.63,-4570.33 ccw(c-1642.68,-4570.33) -1651.13,-4578.78 -1589.45,-4578.78 ccw(c-1589.45,-4551.47) -1570.13,-4570.78 ccw(c-1600.63,-4540.29) -1557.5,-4540.29 v1(-1557.5,-4503.69) ; v1(-1580.13,-4345.78) -1594.66,-4360.31 -1700.63,-4360.31 cw(c-1700.63,-4339.71) -1721.24,-4339.71 -1721.24,-4254.8
  Top Layer w15: -1657.13,-4527.78 -1654.63,-4530.28
  Top Layer w16: SB7C.2@-1993.13,-4334.28 -1961.63,-4334.28 P3C.1@-1927.13,-4299.78
  Top Layer w20: P3C.1@-1927.13,-4299.78 v1(-1927.13,-4260.78)
  Bottom Layer w10: -140.1,-826.38 -140.1,-794.97 177.24,-477.63 J1.9@177.24,-83.01
  Bottom Layer w12: v1(-1755.31,-4051.29) -1754.56,-3372.22 cw(c-550.22,-3356.58) -942.89,-2217.94 ccw(c-1390.76,-1050.1) -140.1,-1033.09 -140.1,-826.38 ; v1@-1661.84,-4273.07 v1(-1661.13,-4273.78) ; v1(-1580.13,-4345.78) cw(c-1634.77,-4400.42) -1557.5,-4400.42 v1(-1557.5,-4503.69)
  Bottom Layer w15: v1(-1927.13,-4260.78) cw(c-1886.09,-4301.83) -1886.09,-4243.78 -1732.55,-4243.78 cw(c-1732.55,-4343.78) -1661.84,-4273.07 v1(-1661.13,-4273.78)
MeasureD: J1.13 LED1D.1 P3D.1 SB7D.2 SB8D.2 | length 5265.2
  Top Layer w12: v1(188.17,-4051.29) 188.17,-4122.99 ccw(c256.88,-4123.05) 207.99,-4171.33 cw(c173.58,-4205.74) 222.24,-4205.74 222.24,-4254.8 ; v1(282.35,-4273.78) 241.23,-4273.78 cw(c241.23,-4254.8) 222.24,-4254.8 ; SB8D.2@288.85,-4555.78 288.85,-4570.33 ccw(c300.8,-4570.33) 292.35,-4578.78 354.04,-4578.78 ccw(c354.04,-4551.47) 373.35,-4570.78 ccw(c342.85,-4540.29) 385.98,-4540.29 v1(385.98,-4503.69) ; v1(363.35,-4345.78) 348.82,-4360.31 242.85,-4360.31 cw(c242.85,-4339.71) 222.24,-4339.71 222.24,-4254.8
  Top Layer w16: SB7D.2@-49.65,-4334.28 -18.15,-4334.28 P3D.1@16.35,-4299.78
  Top Layer w20: P3D.1@16.35,-4299.78 v1(16.35,-4260.78)
  Bottom Layer w10: 187.14,-826.74 187.14,-609.73 255.98,-540.89 J1.13@255.98,-83.01
  Bottom Layer w12: v1@187.83,-4052.63 v1(188.17,-4051.29) 187.83,-827.43 ; v1@281.64,-4273.07 v1(282.35,-4273.78) ; v1(363.35,-4345.78) cw(c308.71,-4400.42) 385.98,-4400.42 v1(385.98,-4503.69)
  Bottom Layer w15: v1(16.35,-4260.78) cw(c57.39,-4301.83) 57.39,-4243.78 210.93,-4243.78 cw(c210.93,-4343.78) 281.64,-4273.07 v1(282.35,-4273.78)
MeasureE: J1.17 LED1E.1 P3E.1 SB7E.2 SB8E.2 | length 6001.7
  Top Layer w12: v1(2150.33,-4051.29) 2150.33,-4122.99 ccw(c2219.05,-4123.05) 2170.16,-4171.33 cw(c2135.75,-4205.74) 2184.41,-4205.74 2184.41,-4254.8 ; v1(2244.52,-4273.78) 2203.4,-4273.78 cw(c2203.4,-4254.8) 2184.41,-4254.8 ; SB8E.2@2251.02,-4555.78 2251.02,-4570.33 ccw(c2262.97,-4570.33) 2254.52,-4578.78 2316.2,-4578.78 ccw(c2316.2,-4551.47) 2335.52,-4570.78 ccw(c2305.02,-4540.29) 2348.15,-4540.29 v1(2348.15,-4503.69) ; v1(2325.52,-4345.78) 2310.99,-4360.31 2205.02,-4360.31 cw(c2205.02,-4339.71) 2184.41,-4339.71 2184.41,-4254.8
  Top Layer w16: SB7E.2@1912.52,-4334.28 1944.02,-4334.28 P3E.1@1978.52,-4299.78
  Top Layer w20: P3E.1@1978.52,-4299.78 v1(1978.52,-4260.78)
  Bottom Layer w10: J1.17@334.72,-83.01 334.72,-527.07 533.26,-725.61 533.26,-826.03
  Bottom Layer w12: 533.26,-826.03 533.26,-1033.19 ccw(c1728.96,-1039.44) 1265.89,-2141.85 cw(c834.02,-3385.03) 2150,-3370.61 v1@2150,-4051.29 ; v1(2325.52,-4345.78) cw(c2270.88,-4400.42) 2348.15,-4400.42 v1(2348.15,-4503.69)
  Bottom Layer w15: v1(1978.52,-4260.78) cw(c2019.56,-4301.83) 2019.56,-4243.78 2173.09,-4243.78 cw(c2173.09,-4343.78) 2243.8,-4273.07 v1(2244.52,-4273.78)
MeasureF: J1.21 LED1F.1 P3F.1 SB7F.2 SB8F.2 | length 6586.9
  Top Layer w12: v1(2963.05,-4051.3) 2963.05,-4123 ccw(c3031.76,-4123.05) 2982.87,-4171.33 cw(c2948.46,-4205.74) 2997.12,-4205.74 2997.12,-4254.8 ; v1(3057.23,-4273.79) 3016.11,-4273.79 cw(c3016.11,-4254.8) 2997.12,-4254.8 ; SB8F.2@3063.73,-4555.79 3063.73,-4570.34 ccw(c3075.68,-4570.34) 3067.23,-4578.79 3128.91,-4578.79 ccw(c3128.91,-4551.48) 3148.23,-4570.79 ccw(c3117.73,-4540.29) 3160.86,-4540.29 v1(3160.86,-4503.69) ; v1(3138.23,-4345.79) 3123.7,-4360.32 3017.73,-4360.32 cw(c3017.73,-4339.71) 2997.12,-4339.71 2997.12,-4254.8
  Top Layer w16: SB7F.2@2725.23,-4334.29 2756.73,-4334.29 P3F.1@2791.23,-4299.79
  Top Layer w20: P3F.1@2791.23,-4299.79 v1(2791.23,-4260.79)
  Bottom Layer w10: J1.21@413.46,-83.01 413.46,-504.64 578.92,-670.11 759.75,-670.11 877.84,-788.2 877.84,-826.74
  Bottom Layer w12: 877.84,-826.74 877.84,-945.24 ccw(c2059.63,-962.4) 1867.33,-2128.57 cw(c1674.86,-3401.96) 2962.71,-3399.72 2962.88,-4048.36 v1@2962.71,-4045.43 ; v1(3138.23,-4345.79) cw(c3083.59,-4400.43) 3160.86,-4400.43 v1(3160.86,-4503.69)
  Bottom Layer w15: v1(2791.23,-4260.79) cw(c2832.27,-4301.83) 2832.27,-4243.79 2985.81,-4243.79 cw(c2985.81,-4343.79) 3056.39,-4272.96 cw(c2985.81,-4343.79) 3056.52,-4273.08 v1(3057.23,-4273.79)
MeasureG: J1.25 LED1G.1 P3G.1 SB7G.2 SB8G.2 | length 7202.2
  Top Layer w12: v1(3699.8,-4051.29) 3699.8,-4122.99 ccw(c3768.51,-4123.05) 3719.62,-4171.33 cw(c3685.21,-4205.74) 3733.87,-4205.74 3733.87,-4254.8 ; v1(3793.98,-4273.78) 3752.86,-4273.78 cw(c3752.86,-4254.8) 3733.87,-4254.8 ; SB8G.2@3800.48,-4555.78 3800.48,-4570.33 ccw(c3812.43,-4570.33) 3803.98,-4578.78 3865.66,-4578.78 ccw(c3865.66,-4551.47) 3884.98,-4570.78 ccw(c3854.48,-4540.29) 3897.61,-4540.29 v1(3897.61,-4503.69) ; v1(3874.98,-4345.78) 3860.45,-4360.31 3754.48,-4360.31 cw(c3754.48,-4339.71) 3733.87,-4339.71 3733.87,-4254.8
  Top Layer w16: SB7G.2@3461.98,-4334.28 3493.48,-4334.28 P3G.1@3527.98,-4299.78
  Top Layer w20: P3G.1@3527.98,-4299.78 v1(3527.98,-4260.78)
  Bottom Layer w10: J1.25@492.2,-83.01 492.2,-482.55 611.75,-602.11 791.75,-602.11 867.75,-678.11 926.47,-678.11
  Bottom Layer w12: 926.47,-678.11 1057.75,-678.11 cw(c1059.95,-3317.31) 3699.14,-3315.11 v1(3699.8,-4051.29) v1@3699.14,-4045.83 ; v1(3874.98,-4345.78) cw(c3820.34,-4400.42) 3897.61,-4400.42 v1(3897.61,-4503.69) ; v1@3793.27,-4273.07 v1(3793.98,-4273.78) v1@3793.25,-4273.06
  Bottom Layer w15: v1(3527.98,-4260.78) cw(c3569.02,-4301.83) 3569.02,-4243.78 3722.56,-4243.78 cw(c3722.56,-4343.78) 3793.27,-4273.07 v1(3793.98,-4273.78)
MeasureH: J1.29 LED1H.1 P3H.1 SB7H.2 SB8H.2 | length 7907.4
  Top Layer w12: v1(4369.27,-4051.29) 4369.27,-4122.99 ccw(c4437.99,-4123.05) 4389.09,-4171.33 cw(c4354.68,-4205.74) 4403.34,-4205.74 4403.34,-4254.8 ; v1(4463.45,-4273.78) 4422.33,-4273.78 cw(c4422.33,-4254.8) 4403.35,-4254.8 ; SB8H.2@4469.95,-4555.78 4469.95,-4570.33 ccw(c4481.9,-4570.33) 4473.45,-4578.78 4535.14,-4578.78 ccw(c4535.14,-4551.47) 4554.45,-4570.78 ccw(c4523.96,-4540.29) 4567.08,-4540.29 v1(4567.08,-4503.69) ; v1(4544.45,-4345.78) 4529.92,-4360.31 4423.95,-4360.31 cw(c4423.95,-4339.71) 4403.34,-4339.71 4403.34,-4254.8
  Top Layer w16: SB7H.2@4131.45,-4334.28 4162.95,-4334.28 P3H.1@4197.45,-4299.78
  Top Layer w20: P3H.1@4197.45,-4299.78 v1(4197.45,-4260.78)
  Bottom Layer w10: J1.29@570.94,-83.01 570.94,-447.29 ccw(c584.75,-447.29) 584.75,-461.11 618.01,-461.11 ccw(c618.01,-447.37) 631.75,-447.37 631.75,-370.11 684.75,-317.11 925.05,-317.11
  Bottom Layer w12: 925.05,-317.11 1176.75,-317.11 cw(c1178.7,-3508.41) 4370,-3506.47 4370,-4049.11 v1@4370,-4049.18 ; v1(4544.45,-4345.78) cw(c4489.81,-4400.42) 4567.08,-4400.42 v1(4567.08,-4503.69)
  Bottom Layer w15: v1(4197.45,-4260.78) cw(c4238.49,-4301.83) 4238.49,-4243.78 4392.03,-4243.78 cw(c4392.03,-4343.78) 4462.74,-4273.07 v1(4463.45,-4273.78)
MIDA: P1A.2 U1A.1 | length 1105.1
  Top Layer w22: U1A.1@-3363.57,-5244.78 -3275.78,-5244.78 -3262.89,-5231.9 -3262.89,-5090.78 v1(-3226.89,-5054.78)
  Bottom Layer w10: -3274.7,-4515.98 -3255.7,-4515.98 -3231.89,-4539.78 -3231.89,-4758.78 -3221.26,-4769.42 -3221.26,-4938.15 -3251.85,-4968.74 -3251.85,-5029.83 v1(-3226.89,-5054.78)
  Bottom Layer w18: P1A.2@-3417.45,-4505.78 -3407.26,-4515.98 -3274.7,-4515.98
  Bottom Layer w22: P1A.2@-3463.38,-4459.85 P1A.2@-3417.45,-4505.78
MIDB: P1B.2 U1B.1 | length 1105.1
  Top Layer w22: U1B.1@-2794.6,-5244.78 -2706.8,-5244.78 -2693.92,-5231.9 -2693.92,-5090.78 v1(-2657.92,-5054.78)
  Bottom Layer w10: -2705.73,-4515.98 -2686.72,-4515.98 -2662.92,-4539.78 -2662.92,-4758.78 -2652.28,-4769.42 -2652.28,-4938.15 -2682.87,-4968.74 -2682.87,-5029.83 v1(-2657.92,-5054.78)
  Bottom Layer w18: P1B.2@-2848.48,-4505.78 -2838.28,-4515.98 -2705.73,-4515.98
  Bottom Layer w22: P1B.2@-2894.41,-4459.85 P1B.2@-2848.48,-4505.78
MIDC: P1C.2 U1C.1 | length 1104.7
  Top Layer w22: U1C.1@-1694.81,-5244.78 -1607.02,-5244.78 -1594.13,-5231.9 -1594.13,-5090.78 v1(-1558.13,-5054.78)
  Bottom Layer w10: -1605.94,-4515.98 -1586.94,-4515.98 -1563.13,-4539.78 -1563.13,-4758.78 -1552.58,-4769.34 -1552.58,-4938.23 -1582.76,-4968.41 -1582.76,-5030.16 v1(-1558.13,-5054.78)
  Bottom Layer w18: P1C.2@-1748.69,-4505.78 -1738.5,-4515.98 -1605.94,-4515.98
  Bottom Layer w22: P1C.2@-1794.62,-4459.85 P1C.2@-1748.69,-4505.78
MIDD: P1D.2 U1D.1 | length 1105.1
  Top Layer w22: U1D.1@248.67,-5244.78 336.46,-5244.78 349.35,-5231.9 349.35,-5090.78 v1(385.35,-5054.78)
  Bottom Layer w10: 337.54,-4515.97 356.54,-4515.97 380.35,-4539.78 380.35,-4758.78 390.99,-4769.42 390.99,-4938.15 360.4,-4968.74 360.4,-5029.83 v1(385.35,-5054.78)
  Bottom Layer w18: P1D.2@194.79,-4505.78 204.98,-4515.97 337.54,-4515.97
  Bottom Layer w22: P1D.2@148.86,-4459.85 P1D.2@194.79,-4505.78
MIDE: P1E.2 U1E.1 | length 1104.2
  Top Layer w22: U1E.1@2210.83,-5244.78 2298.63,-5244.78 2311.52,-5231.9 2311.52,-5090.78 v1(2347.52,-5054.78)
  Bottom Layer w10: 2299.71,-4515.98 2318.71,-4515.98 2342.52,-4539.78 2342.52,-4758.78 2353.47,-4769.74 2353.47,-4937.83 2323.86,-4967.44 2323.86,-5031.12 v1(2347.52,-5054.78)
  Bottom Layer w18: P1E.2@2156.96,-4505.78 2167.15,-4515.98 2299.71,-4515.98
  Bottom Layer w22: P1E.2@2111.03,-4459.85 P1E.2@2156.96,-4505.78
MIDF: P1F.2 U1F.1 | length 1104.2
  Top Layer w22: U1F.1@3023.55,-5244.79 3111.34,-5244.79 3124.23,-5231.9 3124.23,-5090.79 v1(3160.23,-5054.79)
  Bottom Layer w10: 3112.42,-4515.98 3131.42,-4515.98 3155.23,-4539.79 3155.23,-4758.79 3166.18,-4769.75 3166.18,-4937.83 3136.57,-4967.45 3136.57,-5031.13 v1(3160.23,-5054.79)
  Bottom Layer w18: P1F.2@2969.67,-4505.79 2979.86,-4515.98 3112.42,-4515.98
  Bottom Layer w22: P1F.2@2923.74,-4459.86 P1F.2@2969.67,-4505.79
MIDG: P1G.2 U1G.1 | length 1104.2
  Top Layer w22: U1G.1@3760.3,-5244.78 3848.09,-5244.78 3860.98,-5231.9 3860.98,-5090.78 v1(3896.98,-5054.78)
  Bottom Layer w10: 3849.17,-4515.97 3868.17,-4515.97 3891.98,-4539.78 3891.98,-4758.78 3902.93,-4769.74 3902.93,-4937.83 3873.32,-4967.44 3873.32,-5031.12 v1(3896.98,-5054.78)
  Bottom Layer w18: P1G.2@3706.42,-4505.78 3716.61,-4515.97 3849.17,-4515.97
  Bottom Layer w22: P1G.2@3660.49,-4459.85 P1G.2@3706.42,-4505.78
MIDH: P1H.2 U1H.1 | length 1104.2
  Top Layer w22: U1H.1@4429.77,-5244.78 4517.57,-5244.78 4530.45,-5231.9 4530.45,-5090.78 v1(4566.45,-5054.78)
  Bottom Layer w10: 4518.64,-4515.98 4537.64,-4515.98 4561.45,-4539.78 4561.45,-4758.78 4572.41,-4769.74 4572.41,-4937.83 4542.79,-4967.44 4542.79,-5031.12 v1(4566.45,-5054.78)
  Bottom Layer w18: P1H.2@4375.89,-4505.78 4386.08,-4515.98 4518.64,-4515.98
  Bottom Layer w22: P1H.2@4329.96,-4459.85 P1H.2@4375.89,-4505.78
NetC1A_2: C1A.2 C2A.2 SB5A.1 SB6A.1 | length 1120.1
  Top Layer w12: v1(-3659.76,-5062.7) -3691.81,-5062.7 -3704.89,-5075.78 -3704.89,-5270.17 -3679.28,-5295.78 C1A.2@-3594.89,-5295.78
  Top Layer w25: -3594.89,-5337.28 C1A.2@-3594.89,-5295.78
  Bottom Layer w10: v1(-3659.76,-5062.7) -3659.76,-5015.65 -3639.85,-4995.74 -3392.13,-4993.6 -3392.05,-4993.6 -3379.87,-4993.6 -3376.91,-4993.46 -3321.72,-4992.98 -3295.89,-4967.16 -3254.05,-4925.32 -3254.05,-4806.62 -3288.89,-4771.78 v1(-3288.89,-4715.78)
NetC1B_2: C1B.2 C2B.2 SB5B.1 SB6B.1 | length 1120.1
  Top Layer w12: v1(-3090.79,-5062.7) -3122.83,-5062.7 -3135.92,-5075.78 -3135.92,-5270.17 -3110.3,-5295.78 C1B.2@-3025.92,-5295.78
  Top Layer w25: -3025.92,-5337.28 C1B.2@-3025.92,-5295.78
  Bottom Layer w10: v1(-3090.79,-5062.7) -3090.79,-5015.65 -3070.88,-4995.74 -2823.16,-4993.59 -2823.07,-4993.59 -2810.89,-4993.59 -2807.93,-4993.46 -2752.74,-4992.98 -2726.92,-4967.16 -2685.08,-4925.32 -2685.08,-4806.62 -2719.92,-4771.78 v1(-2719.92,-4715.78)
NetC1C_2: C1C.2 C2C.2 SB5C.1 SB6C.1 | length 1120
  Top Layer w12: v1(-1991,-5062.7) -2023.05,-5062.7 -2036.13,-5075.78 -2036.13,-5270.17 -2010.52,-5295.78 C1C.2@-1926.13,-5295.78
  Top Layer w25: -1926.13,-5337.28 C1C.2@-1926.13,-5295.78
  Bottom Layer w10: v1(-1991,-5062.7) -1991,-5015.65 -1971.09,-4995.74 -1723.37,-4993.6 -1723.29,-4993.6 -1711.11,-4993.6 -1708.15,-4993.46 -1652.96,-4992.98 -1627.13,-4967.16 -1585.37,-4925.4 -1585.37,-4806.54 -1620.13,-4771.78 v1(-1620.13,-4715.78)
NetC1D_2: C1D.2 C2D.2 SB5D.1 SB6D.1 | length 1120.1
  Top Layer w12: v1(-47.52,-5062.7) -79.56,-5062.7 -92.65,-5075.78 -92.65,-5270.17 -67.03,-5295.78 C1D.2@17.35,-5295.78
  Top Layer w25: 17.35,-5337.28 C1D.2@17.35,-5295.78
  Bottom Layer w10: v1(-47.52,-5062.7) -47.52,-5015.65 -27.61,-4995.74 220.11,-4993.59 220.2,-4993.59 232.38,-4993.59 235.33,-4993.46 290.52,-4992.98 316.35,-4967.16 358.19,-4925.32 358.19,-4806.62 323.35,-4771.78 v1(323.35,-4715.78)
NetC1E_2: C1E.2 C2E.2 SB5E.1 SB6E.1 | length 1120.3
  Top Layer w12: v1(1914.65,-5062.7) 1882.6,-5062.7 1869.52,-5075.78 1869.52,-5270.17 1895.13,-5295.78 C1E.2@1979.52,-5295.78
  Top Layer w25: 1979.52,-5337.28 C1E.2@1979.52,-5295.78
  Bottom Layer w10: v1(1914.65,-5062.7) 1914.65,-5015.65 1934.56,-4995.74 2182.27,-4993.6 2182.36,-4993.59 2194.54,-4993.59 2197.5,-4993.46 2252.69,-4992.98 2278.52,-4967.16 2320.68,-4925 2320.68,-4806.95 2285.52,-4771.78 v1(2285.52,-4715.78)
NetC1F_2: C1F.2 C2F.2 SB5F.1 SB6F.1 | length 1120.3
  Top Layer w12: v1(2727.36,-5062.7) 2695.31,-5062.7 2682.23,-5075.79 2682.23,-5270.17 2707.84,-5295.79 C1F.2@2792.23,-5295.79
  Top Layer w25: 2792.23,-5337.29 C1F.2@2792.23,-5295.79
  Bottom Layer w10: v1(2727.36,-5062.7) 2727.36,-5015.66 2747.27,-4995.75 2994.99,-4993.6 2995.07,-4993.6 3007.26,-4993.6 3010.21,-4993.47 3065.4,-4992.99 3091.23,-4967.16 3133.39,-4925 3133.39,-4806.95 3098.23,-4771.79 v1(3098.23,-4715.79)
NetC1G_2: C1G.2 C2G.2 SB5G.1 SB6G.1 | length 1120.3
  Top Layer w12: v1(3464.11,-5062.7) 3432.06,-5062.7 3418.98,-5075.78 3418.98,-5270.17 3444.59,-5295.78 C1G.2@3528.98,-5295.78
  Top Layer w25: 3528.98,-5337.28 C1G.2@3528.98,-5295.78
  Bottom Layer w10: v1(3464.11,-5062.7) 3464.11,-5015.65 3484.02,-4995.74 3731.74,-4993.59 3731.82,-4993.59 3744,-4993.59 3746.96,-4993.46 3802.15,-4992.98 3827.98,-4967.16 3870.14,-4924.99 3870.14,-4806.94 3834.98,-4771.78 v1(3834.98,-4715.78)
NetC1H_2: C1H.2 C2H.2 SB5H.1 SB6H.1 | length 1120.3
  Top Layer w12: v1(4133.58,-5062.7) 4101.54,-5062.7 4088.45,-5075.78 4088.45,-5270.17 4114.07,-5295.78 C1H.2@4198.45,-5295.78
  Top Layer w25: 4198.45,-5337.28 C1H.2@4198.45,-5295.78
  Bottom Layer w10: v1(4133.58,-5062.7) 4133.58,-5015.65 4153.49,-4995.74 4401.21,-4993.6 4401.3,-4993.6 4413.48,-4993.6 4416.43,-4993.46 4471.62,-4992.99 4497.45,-4967.16 4539.61,-4925 4539.61,-4806.95 4504.45,-4771.78 v1(4504.45,-4715.78)
NetC3A_2: C3A.2 R4A.2
NetC3B_2: C3B.2 R4B.2
NetC3C_2: C3C.2 R4C.2
NetC3D_2: C3D.2 R4D.2
NetC3E_2: C3E.2 R4E.2
NetC3F_2: C3F.2 R4F.2
NetC3G_2: C3G.2 R4G.2
NetC3H_2: C3H.2 R4H.2
NetC4A_2: C4A.2 R7A.1 R8A.1 U2A.9 | length 353.4
  Top Layer w10: C4A.2@-3567.37,-4599.78 C4A.2@-3571.37,-4603.78 -3571.37,-4582.64 -3565.51,-4576.78 -3456.87,-4576.78 ; R7A.1@-3466.87,-4608.28 R7A.1@-3463.37,-4604.78 R7A.1@-3463.37,-4614.26 ; R7A.1@-3459.87,-4611.78 -3452.87,-4604.78 R8A.1@-3430.87,-4604.78
  Top Layer w12: U2A.9@-3600.11,-4678.6 -3527.71,-4678.6 R7A.1@-3463.37,-4614.26